# Altium PCB MB1364.PcbDoc (part 2 of 9)
Units mm, origin at the board's own origin, x right, y up, seen from the top; angles counter-clockwise.
Board outline 70 x 133.34 mm, 6 copper layers (Top Layer, Signal Layer 1, Signal Layer 2, Signal Layer 3, Signal Layer 4, Bottom Layer), stack 1.57 mm thick; 321 components, 287 nets, 1372 pads, 2051 vias.
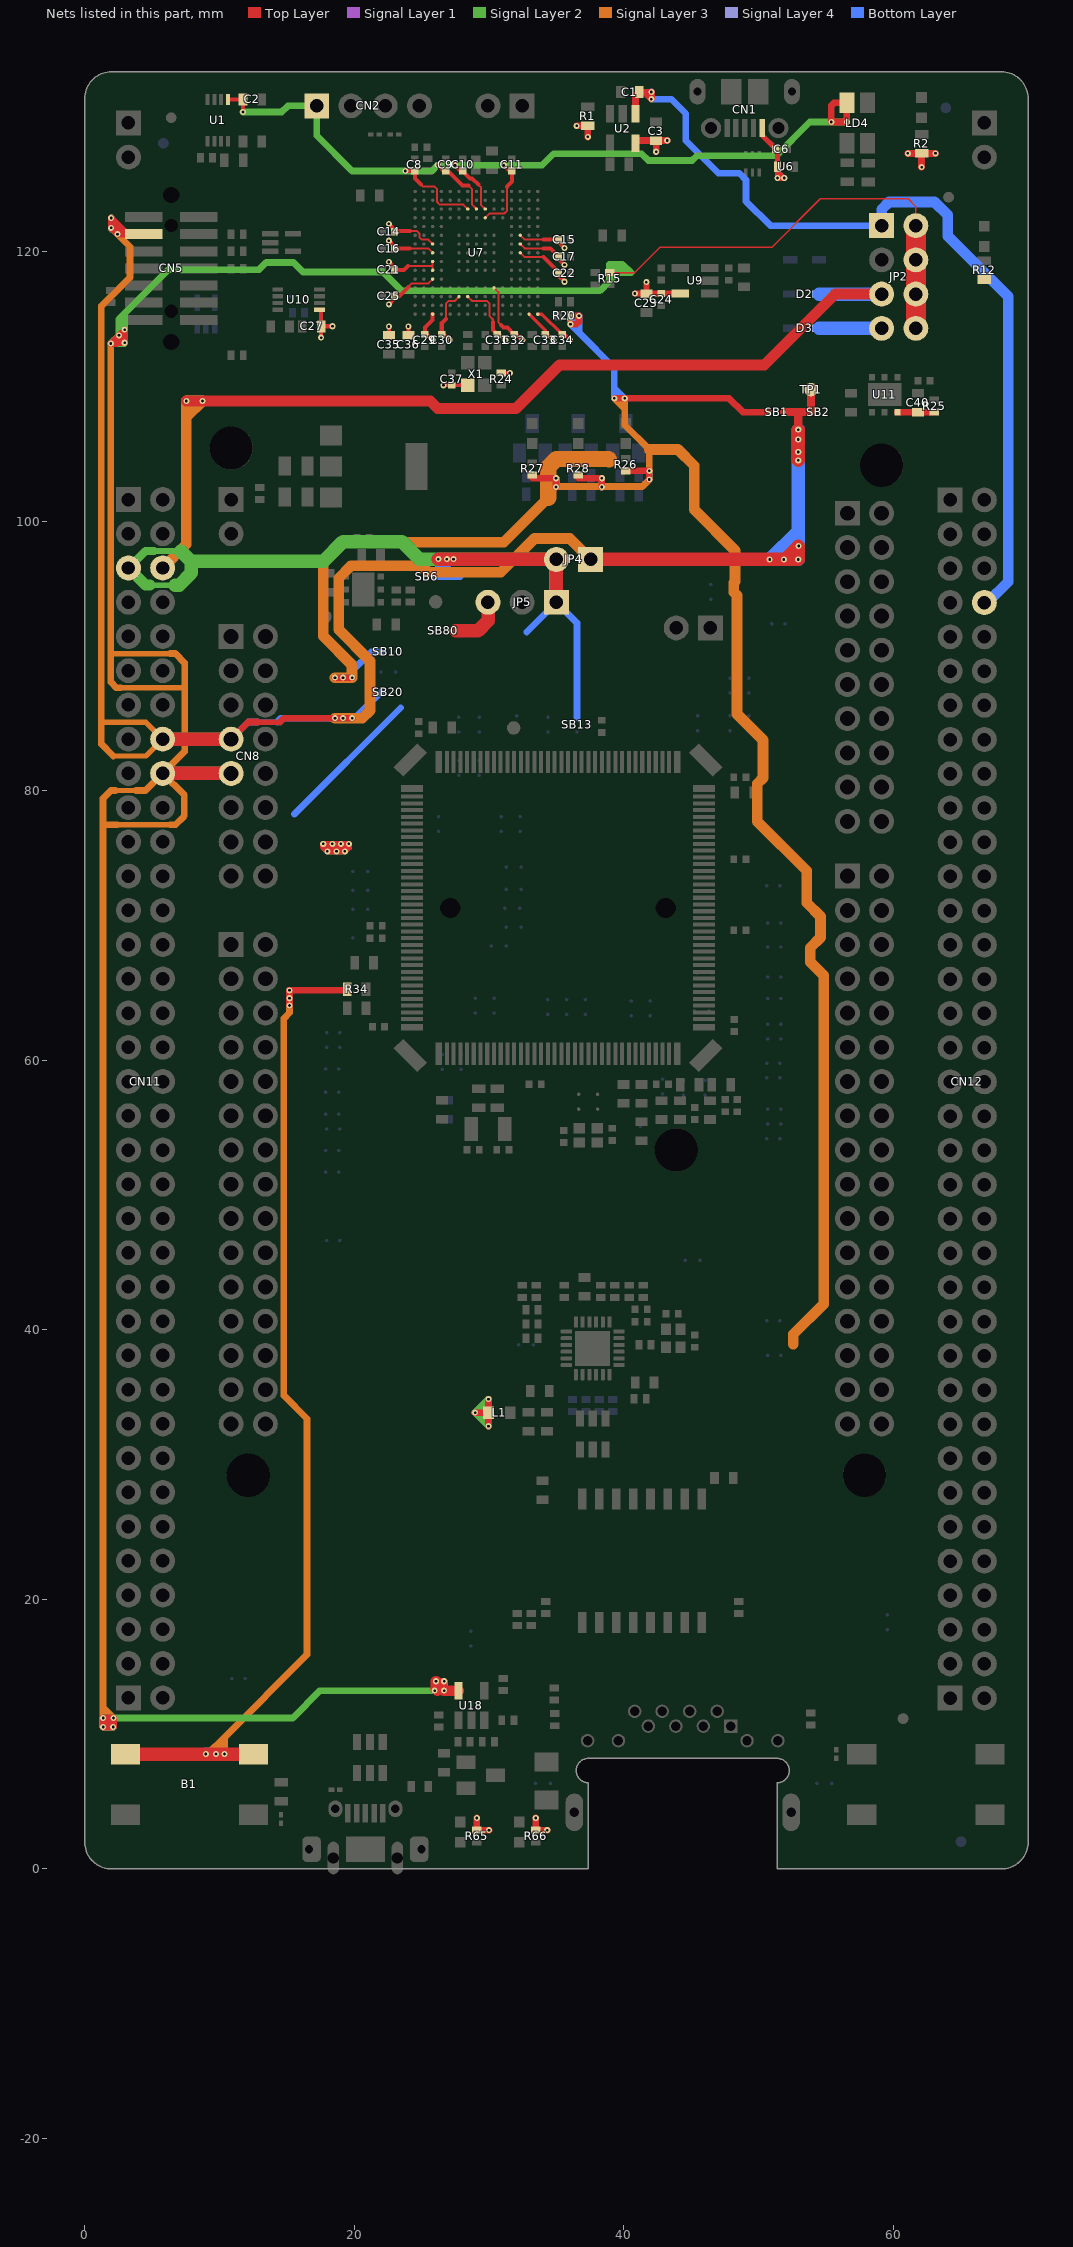
[diagram p6: the nets of this part, all layers, seen from the top]

## Footprints (in the part's own frame and the unit in brackets; to place one, negate y for a bottom-side part, rotate by r counter-clockwise, add the part's x,y. Pads: shape width x height; smd on the part's side, far side on the other; paste and mask are expansions set on the pad) (continued)
ICC_UFBGA201_176+25_10X10_P065 [mm] "IPC"
  round 0.25 smd mask+0.05: A1(-4.55,4.55) A2(-3.9,4.55) A3(-3.25,4.55) A4(-2.6,4.55) A5(-1.95,4.55) A6(-1.3,4.55) A7(-0.65,4.55) A8(0,4.55) A9(0.65,4.55) A10(1.3,4.55) A11(1.95,4.55) A12(2.6,4.55) A13(3.25,4.55) A14(3.9,4.55) A15(4.55,4.55) B1(-4.55,3.9) B2(-3.9,3.9) B3(-3.25,3.9) B4(-2.6,3.9) B5(-1.95,3.9) B6(-1.3,3.9) B7(-0.65,3.9) B8(0,3.9) B9(0.65,3.9) B10(1.3,3.9) B11(1.95,3.9) B12(2.6,3.9) B13(3.25,3.9) B14(3.9,3.9) B15(4.55,3.9) C1(-4.55,3.25) C2(-3.9,3.25) C3(-3.25,3.25) C4(-2.6,3.25) C5(-1.95,3.25) C6(-1.3,3.25) C7(-0.65,3.25) C8(0,3.25) C9(0.65,3.25) C10(1.3,3.25) C11(1.95,3.25) C12(2.6,3.25) C13(3.25,3.25) C14(3.9,3.25) C15(4.55,3.25) D1(-4.55,2.6) D2(-3.9,2.6) D3(-3.25,2.6) D4(-2.6,2.6) D5(-1.95,2.6) D6(-1.3,2.6) D7(-0.65,2.6) D8(0,2.6) D9(0.65,2.6) D10(1.3,2.6) D11(1.95,2.6) D12(2.6,2.6) D13(3.25,2.6) D14(3.9,2.6) D15(4.55,2.6) E1(-4.55,1.95) E2(-3.9,1.95) E3(-3.25,1.95) E4(-2.6,1.95) E12(2.6,1.95) E13(3.25,1.95) E14(3.9,1.95) E15(4.55,1.95) F1(-4.55,1.3) F2(-3.9,1.3) F3(-3.25,1.3) F4(-2.6,1.3) F6(-1.3,1.3) F7(-0.65,1.3) F8(0,1.3) F9(0.65,1.3) F10(1.3,1.3) F12(2.6,1.3) F13(3.25,1.3) F14(3.9,1.3) F15(4.55,1.3) G1(-4.55,0.65) G2(-3.9,0.65) G3(-3.25,0.65) G4(-2.6,0.65) G6(-1.3,0.65) G7(-0.65,0.65) G8(0,0.65) G9(0.65,0.65) G10(1.3,0.65) G12(2.6,0.65) G13(3.25,0.65) G14(3.9,0.65) G15(4.55,0.65) H1(-4.55,0) H2(-3.9,0) H3(-3.25,0) H4(-2.6,0) H6(-1.3,0) H7(-0.65,0) H8(0,0) H9(0.65,0) H10(1.3,0) H12(2.6,0) H13(3.25,0) H14(3.9,0) H15(4.55,0) J1(-4.55,-0.65) J2(-3.9,-0.65) J3(-3.25,-0.65) J4(-2.6,-0.65) J6(-1.3,-0.65) J7(-0.65,-0.65) J8(0,-0.65) J9(0.65,-0.65) J10(1.3,-0.65) J12(2.6,-0.65) J13(3.25,-0.65) J14(3.9,-0.65) J15(4.55,-0.65) K1(-4.55,-1.3) K2(-3.9,-1.3) K3(-3.25,-1.3) K4(-2.6,-1.3) K6(-1.3,-1.3) K7(-0.65,-1.3) K8(0,-1.3) K9(0.65,-1.3) K10(1.3,-1.3) K12(2.6,-1.3) K13(3.25,-1.3) K14(3.9,-1.3) K15(4.55,-1.3) L1(-4.55,-1.95) L2(-3.9,-1.95) L3(-3.25,-1.95) L4(-2.6,-1.95) L12(2.6,-1.95) L13(3.25,-1.95) L14(3.9,-1.95) L15(4.55,-1.95) M1(-4.55,-2.6) M2(-3.9,-2.6) M3(-3.25,-2.6) M4(-2.6,-2.6) M5(-1.95,-2.6) M6(-1.3,-2.6) M7(-0.65,-2.6) M8(0,-2.6) M9(0.65,-2.6) M10(1.3,-2.6) M11(1.95,-2.6) M12(2.6,-2.6) M13(3.25,-2.6) M14(3.9,-2.6) M15(4.55,-2.6) N1(-4.55,-3.25) N2(-3.9,-3.25) N3(-3.25,-3.25) N4(-2.6,-3.25) N5(-1.95,-3.25) N6(-1.3,-3.25) N7(-0.65,-3.25) N8(0,-3.25) N9(0.65,-3.25) N10(1.3,-3.25) N11(1.95,-3.25) N12(2.6,-3.25) N13(3.25,-3.25) N14(3.9,-3.25) N15(4.55,-3.25) P1(-4.55,-3.9) P2(-3.9,-3.9) P3(-3.25,-3.9) P4(-2.6,-3.9) P5(-1.95,-3.9) P6(-1.3,-3.9) P7(-0.65,-3.9) P8(0,-3.9) P9(0.65,-3.9) P10(1.3,-3.9) P11(1.95,-3.9) P12(2.6,-3.9) P13(3.25,-3.9) P14(3.9,-3.9) P15(4.55,-3.9) R1(-4.55,-4.55) R2(-3.9,-4.55) R3(-3.25,-4.55) R4(-2.6,-4.55) R5(-1.95,-4.55) R6(-1.3,-4.55) R7(-0.65,-4.55) R8(0,-4.55) R9(0.65,-4.55) R10(1.3,-4.55) R11(1.95,-4.55) R12(2.6,-4.55) R13(3.25,-4.55) R14(3.9,-4.55) R15(4.55,-4.55)
  silkscreen extent -5.22,-5.07 5.07,5.23, body extent -5.07,-5.07 5.07,5.07, height 0.61
ICC_VQFN24-EPAD_4X4_P050 [mm]
  rrect50% 0.85x0.3 smd mask+0.05: 1(-1.95,1.25) 2(-1.95,0.75) 3(-1.95,0.25) 4(-1.95,-0.25) 5(-1.95,-0.75) 6(-1.95,-1.25) 13(1.95,-1.25) 14(1.95,-0.75) 15(1.95,-0.25) 16(1.95,0.25) 17(1.95,0.75) 18(1.95,1.25)
  rrect50% 0.3x0.85 smd mask+0.05: 7(-1.25,-1.95) 8(-0.75,-1.95) 9(-0.25,-1.95) 10(0.25,-1.95) 11(0.75,-1.95) 12(1.25,-1.95) 19(1.25,1.95) 20(0.75,1.95) 21(0.25,1.95) 22(-0.25,1.95) 23(-0.75,1.95) 24(-1.25,1.95)
  rect 2.6x2.6 smd paste-10 mask+0.05: EP(0,0)
  silkscreen extent -2,-2 2,2, body extent -2.05,-2.05 2.05,2.05, height 1.1
ICC_VSSOP8_DCU_R-PDSO-G8_2X2P30_P050 [mm]
  rect 0.3x0.8 smd mask+0.05: 1(-0.75,-1.55) 2(-0.25,-1.55) 3(0.25,-1.55) 4(0.75,-1.55) 5(0.75,1.55) 6(0.25,1.55) 7(-0.25,1.55) 8(-0.75,1.55)
  silkscreen extent -1.05,-1.2 1.05,1.2, body extent -1.05,-1.62 1.05,1.62, height 0.9
L0603 [mm]
  rect 0.8x0.95 smd mask+0.05: 1(-0.8,0) 2(0.8,0)
  silkscreen extent -1.33,-0.6 1.33,0.6, body extent -0.87,-0.47 0.87,0.47, height 0.95
LED_0603_OSRAM_LG-Q396-PS-35_GREEN_1A2K_H0P4 [mm]
  rect 0.8x0.8 smd mask+0.05: 1(-0.75,0) 2(0.75,0)
  silkscreen extent -0.85,-0.53 1.28,0.53, body extent -0.85,-0.45 0.85,0.45, height 0.6
LED_0603_OSRAM_LS-Q976-NR-1_RED_1A2K_H0P8 [mm]
  rect 0.8x0.8 smd mask+0.05: 1(-0.75,0) 2(0.75,0)
  silkscreen extent -0.85,-0.53 1.28,0.53, body extent -0.85,-0.45 0.85,0.45, height 0.8
LED_0603_OSRAM_LY-Q396-P1Q2-36_YELLOW_1A2K_H0P4 [mm]
  rect 0.8x0.8 smd mask+0.05: 1(-0.75,0) 2(0.75,0)
  silkscreen extent -0.85,-0.53 1.28,0.53, body extent -0.85,-0.45 0.85,0.45, height 0.4
LED_0603_RED [mm]
  rect 0.8x0.8 smd mask+0.05: 1(-0.75,0) 2(0.75,0)
  silkscreen extent -0.25,-0.4 1.25,0.4, body extent -0.8,-0.4 0.8,0.4, height 0.6
LED_0603_VISHAY_VLMS1300-GS08_RED_1A2K_H0P8 [mm]
  rect 0.8x0.8 smd mask+0.05: 1(-0.75,0) 2(0.75,0)
  silkscreen extent -0.85,-0.53 1.28,0.53, body extent -0.85,-0.45 0.85,0.45, height 0.8
LED_BI-GR_HSMF-A201-A00J1 [mm]
  rect 1.1x1.5 smd mask+0.05: 1(-0.75,-1.5) 2(-0.75,1.5) 3(0.75,1.5) 4(0.75,-1.5)
  silkscreen extent -1.65,-1.85 1.65,1.85, body extent -1.5,-1.85 1.5,1.85, height 2.1
MIRE_PLACE_SMD_0P8MM [mm]
  round 0.8 smd paste-10 mask+0.2: 1(0,0)
  Top Layer keep-out circle w0.01: c0,0 r0.804
MOS_SOT23-5L [mm]
  rect 0.6x1.3 smd mask+0.05: 1(-0.95,-1.1) 2(0,-1.1) 3(0.95,-1.1) 4(0.95,1.1) 5(-0.95,1.1)
  silkscreen extent -1.6,-0.95 1.6,0.97, body extent -1.52,-1.25 1.52,1.25, height 1.45
NPN_SOT23 [mm]
  rect 1x1.4 smd mask+0.05: 1(-0.95,-1.1) 2(0.95,-1.1) 3(0,1.1)
  silkscreen extent -1.63,-0.82 1.63,0.82, body extent -1.56,-1.25 1.56,1.25, height 1.1
OSC_NDK_NZ2520SB_4P [mm]
  rect 1x1 smd mask+0.05: 1(-0.825,-0.625) 2(0.825,-0.625) 3(0.825,0.625) 4(-0.825,0.625)
  silkscreen extent -1.43,-1.22 1.2,1.05, body extent -1.3,-1.05 1.3,1.05, height 0.91
R0402 [mm]
  rect 0.51x0.7 smd mask+0.05: 1(-0.45,0) 2(0.45,0)
  silkscreen extent 0,-0.3 0,0.3, body extent -0.52,-0.3 0.52,0.3, height 0.4
R0603 [mm]
  rect 0.64x1 smd mask+0.05: 1(-0.7,0) 2(0.7,0)
  silkscreen extent -1.05,-0.58 1.05,0.58, body extent -0.9,-0.5 0.9,0.5, height 0.56
REG_SOT23-5L [mm]
  rect 0.6x1.3 smd mask+0.05: 1(-0.95,-1.1) 2(0,-1.1) 3(0.95,-1.1) 4(0.95,1.1) 5(-0.95,1.1)
  silkscreen extent -1.6,-0.95 1.6,0.97, body extent -1.52,-1.25 1.52,1.25, height 1.1
REG_SOT223-TAB [mm]
  rect 1.5x1.65 smd mask+0.05: 1(-2.3,-3.175) 2(0,-3.175) 3(2.3,-3.175)
  rect 3.5x1.65 smd mask+0.05: 4(0,3.175)
  silkscreen extent -3.35,-2.15 3.35,2.12, body extent -3.35,-3.48 3.35,3.48, height 1.8
Sheetbox_6L2S [mil] "Sheetbox 6 layers / 2 silkscreens"
  round 20 on Mech16: 1(813.5,208.05) 1(2736.63,208.05)
SOLDER-BRIDGE_R0402-0R [mil] "MCD-01619"
  round 10 smd paste-393.7: 1(-17.72,0) 2(20.67,0)
  Top Layer region: -30.51,-13.78 -30.51,13.78 -8.37,13.78 -1.48,0 -8.37,-13.78
  Top Layer region: 1.48,13.78 8.37,0 1.48,-13.78 30.51,-13.78 30.51,13.78
  silkscreen extent -33,-17 33,17, body extent -20,-12 20,12, height 14
SOLDER-BRIDGE_R0603-0R [mil]
  round 10 smd paste-393.7: 1(-19.68,0) 2(23.62,0)
  Top Layer region: -5.91,19.68 13.78,0 -5.91,-19.69 47.24,-19.69 47.24,19.68 -5.91,19.68
  Top Layer region: -47.24,-19.69 -47.24,19.68 -15.75,19.68 3.94,0 -15.75,-19.69 -47.24,-19.69
  silkscreen extent -50,-23 50,23, body extent -36,-20 36,20, height 22
SWI_WEALTHMETAL_TD-0341_4P_BLACK [mm]
  rect 1.52x2.16 smd mask+0.05: 1(-2.25,-4.75) 2(-2.25,4.75) 3(2.25,-4.75) 4(2.25,4.75)
  silkscreen extent -3,-3.5 3,3.5, body extent -3,-5.15 3,5.15, height 7.55
SWI_WEALTHMETAL_TD-0341_4P_BLUE [mm]
  rect 1.52x2.16 smd mask+0.05: 1(-2.25,-4.75) 2(-2.25,4.75) 3(2.25,-4.75) 4(2.25,4.75)
  silkscreen extent -3,-3.5 3,3.5, body extent -3,-5.15 3,5.15, height 7.55
TP_SMD_1MM [mm]
  round 1 smd paste-10 mask+0.05: 1(0,0)
  silkscreen extent -0.7,-0.7 0.7,0.7
TRS_DGKYD_KMS-1102NL [mm]
  rect 0.64x1.55 smd mask+0.05: 1(-4.445,-4.575) 2(-3.175,-4.575) 3(-1.905,-4.575) 4(-0.635,-4.575) 5(0.635,-4.575) 6(1.905,-4.575) 7(3.175,-4.575) 8(4.445,-4.575) 9(4.445,4.575) 10(3.175,4.575) 11(1.905,4.575) 12(0.635,4.575) 13(-0.635,4.575) 14(-1.905,4.575) 15(-3.175,4.575) 16(-4.445,4.575)
  silkscreen extent -6.35,-3.7 6.35,3.7, body extent -6.35,-4.7 6.35,4.7, height 6.3

## Part data
B1: library part MCD-00002, "Non-Open Push-Button 0.1A 24V BLUE", Manufacturer=WEALTHMETAL, Manufacturer_Part_Number=TD0341X-G01-BLU, ComponentLink1Description=Datasheet, ComponentLink1URL=http://tunmcdsvn.tun.st.com/Component_Datasheet_Library/Trunk/Misc/Wealthmetal_Tact-Switch_TD0341, Initial_Board_Reference=MB1274, Internal_Part_Number=MCD-00002, Order_Code_Farnell=535-930, Part_Type=Misc, Provided_By=Subcon, Status=Released
B2: library part MCD-00001, "Non-Open Push-Button 0.1A 24V BLACK", Manufacturer=WEALTHMETAL, Manufacturer_Part_Number=TD0341X-G01-BLA, ComponentLink1Description=Datasheet, ComponentLink1URL=http://tunmcdsvn.tun.st.com/Component_Datasheet_Library/Trunk/Misc/Wealthmetal_Tact-Switch_TD0341, Initial_Board_Reference=MB1274, Internal_Part_Number=MCD-00001, Order_Code_Farnell=535-930, Part_Type=Misc, Provided_By=Subcon, Status=Released
C1 C3 C18 C61 C64 C66: library part MCD-00238, "Capacitor, MLCC, 1uF, 6V3, X5R, 10%, 0603, T=0,8mm", Manufacturer=YAGEO, Manufacturer_Part_Number=CC0603KRX5R5BB105, Package=C0603, ComponentLink1Description=Datasheet, ComponentLink1URL=http://tunmcdsvn.tun.st.com/Component_Datasheet_Library/Trunk/Capacitors/Yageo_Multilayer_capacitor_X5R_series_100pF_to_100uF, Initial_Board_Reference=MB1319, Internal_Part_Number=MCD-00238, Part_Type=Capacitor, Provided_By=Subcon, Status=Released
C2 C4 C26 C27 C44 C59 C65 C68 C73 C78 C79 C80 C82 C83: library part MCD-00237, "Capacitor, MLCC, 100nF, 6V3, X5R, 10%, 0603, T=0,8mm", Manufacturer=YAGEO, Manufacturer_Part_Number=CC0603KRX5R5BB104, Package=C0603, ComponentLink1Description=Datasheet, ComponentLink1URL=http://tunmcdsvn.tun.st.com/Component_Datasheet_Library/Trunk/Capacitors/Yageo_Multilayer_capacitor_X5R_series_100pF_to_100uF, Initial_Board_Reference=MB1319, Internal_Part_Number=MCD-00237, Part_Type=Capacitor, Provided_By=Subcon, Status=Released
C5: library part MCD-00016, "Capacitor, MLCC, 20pF, 50V, NPO, 5%, 0402, T=0,5mm", Manufacturer=YAGEO, Manufacturer_Part_Number=CC0402JRNPO9BN200, Package=C0402, ComponentLink1Description=Datasheet, ComponentLink1URL=http://tunmcdsvn.tun.st.com/Component_Datasheet_Library/Trunk/Capacitors/Yageo_Capacitor_NP0_16V-to-50V, Initial_Board_Reference=MB1274, Internal_Part_Number=MCD-00016, Part_Type=Capacitor, Provided_By=Subcon, Status=Released
C6: library part MCD-00205, "Capacitor, MLCC, 100pF, 50V, NPO, 5%, 0402, T=0,5mm", Manufacturer=YAGEO, Manufacturer_Part_Number=CC0402JRNPO9BN101, Package=C0402, ComponentLink1Description=Datasheet, ComponentLink1URL=http://tunmcdsvn.tun.st.com/Component_Datasheet_Library/Trunk/Capacitors/Yageo_Capacitor_NP0_16V-to-50V, Initial_Board_Reference=MB1361, Internal_Part_Number=MCD-00205, Part_Type=Capacitor, Provided_By=Subcon, Status=Released
C7 C12 C13 C48 C50: library part MCD-00012, "Capacitor, MLCC, 2.2uF, 10V, X5R, 10%, 0603, T=0,8mm", Alternate_Manufacturer=KEMET, Alternate_Manufacturer_Part_Number=C0603C225K8PACTU, Manufacturer=YAGEO, Manufacturer_Part_Number=CC0603KRX5R6BB225, Package=C0603, ComponentLink1Description=Datasheet, ComponentLink1URL=http://tunmcdsvn.tun.st.com/Component_Datasheet_Library/Trunk/Capacitors/Yageo_Multilayer_capacitor_X5R_series_100pF_to_100uF, Initial_Board_Reference=MB1274, Internal_Part_Number=MCD-00012, Part_Type=Capacitor, Status=Released
  C7 C48 C50: Provided_By=Subcon
  C12 C13: Provided_By=SUBCO
C8 C9 C10 C11 C14 C15 C16 C17 C20 C21 C22 C24 C25 C28 C29 C30 C31 C32 C33 C34 C37: library part MCD-00102, "Capacitor, MLCC, 100nF, 16V, X7R, 10%, 0402, T=0,5mm", Manufacturer=YAGEO, Manufacturer_Part_Number=CC0402KRX7R7BB104, Package=C0402, ComponentLink1Description=Datasheet, ComponentLink1URL=http://tunmcdsvn.tun.st.com/Component_Datasheet_Library/Trunk/Capacitors/Yageo_Multilayer_Capacitor_X7R_series_100pF_to_22uF, Initial_Board_Reference=MB1262, Internal_Part_Number=MCD-00102, Part_Type=Capacitor, Provided_By=Subcon, Status=Released
C19: library part MCD-00011, "Capacitor, MLCC, 10nF, 16V, X7R, 10%, 0402, T=0.5mm", Manufacturer=YAGEO, Manufacturer_Part_Number=CC0402KRX7R7BB103, Package=C0402, ComponentLink1Description=Datasheet, ComponentLink1URL=http://tunmcdsvn.tun.st.com/Component_Datasheet_Library/Trunk/Capacitors/Yageo_Multilayer_Capacitor_X7R_series_100pF_to_22uF, Initial_Board_Reference=MB1274, Internal_Part_Number=MCD-00011, Part_Type=Capacitor, Provided_By=Subcon, Status=Released
C23 C36: library part MCD-00010, "Capacitor, MLCC, 1uF, 16V, X5R, 10%, 0603, T=0,8mm", Manufacturer=YAGEO, Manufacturer_Part_Number=CC0603KRX5R7BB105, Package=C0603, ComponentLink1Description=Datasheet, ComponentLink1URL=http://tunmcdsvn.tun.st.com/Component_Datasheet_Library/Trunk/Capacitors/Yageo_Multilayer_capacitor_X5R_series_100pF_to_100uF, Initial_Board_Reference=MB1274, Internal_Part_Number=MCD-00010, Part_Type=Capacitor, Provided_By=Subcon, Status=Released
C35 C84: library part MCD-00009, "Capacitor, MLCC, 4.7uF, 16V, X5R, 10%, 0603, T=0.8mm", Manufacturer=YAGEO, Manufacturer_Part_Number=CC0603KRX5R7BB475, Package=C0603, ComponentLink1Description=Datasheet, ComponentLink1URL=http://tunmcdsvn.tun.st.com/Component_Datasheet_Library/Trunk/Capacitors/Yageo_Multilayer_capacitor_X5R_series_100pF_to_100uF, Initial_Board_Reference=MB1274, Internal_Part_Number=MCD-00009, Part_Type=Capacitor, Provided_By=subcon, Status=Released
C38 C62 C63: library part MCD-00006, "Capacitor, MLCC, 100nF, 16V, X7R, 10%, 0402, T=0.5mm", Manufacturer=YAGEO, Manufacturer_Part_Number=CC0402KRX7R7BB104, Package=C0402, ComponentLink1Description=Datasheet, ComponentLink1URL=http://tunmcdsvn.tun.st.com/Component_Datasheet_Library/Trunk/Capacitors/Yageo_Multilayer_Capacitor_X7R_series_100pF_to_22uF, Initial_Board_Reference=MB1274, Internal_Part_Number=MCD-00006, Part_Type=Capacitor, Provided_By=Subcon, Status=Released
C39 C45 C60: library part MCD-01121, "Capacitor, MLCC, 4.7µF, 10V, X5R, 20%, 0603, T=0,8mm", Manufacturer=MURATA, Manufacturer_Part_Number=GRM188R61A475ME15, Package=C0603, ComponentLink1Description=Datasheet, ComponentLink1URL=http://tunmcdsvn.tun.st.com/Component_Datasheet_Library/Trunk/Capacitors/Murata_Capacitor_GR_series, Initial_Board_Reference=MB1361, Internal_Part_Number=MCD-01121, Part_Type=Capacitor, Provided_By=Subcon, Status=Released
C40 C43: library part MCD-00097, "Capacitor, MLCC, 4.7uF, 16V, X5R, 20%, 0603, T=0,8mm", Manufacturer=MURATA, Manufacturer_Part_Number=GRM188R61C475MAAJ, Package=C0603, ComponentLink1Description=Datasheet, ComponentLink1URL=http://tunmcdsvn.tun.st.com/Component_Datasheet_Library/Trunk/Capacitors/Murata_Capacitor_GR_series, Initial_Board_Reference=MB1262, Internal_Part_Number=MCD-00097, Part_Type=Capacitor, Provided_By=Subcon, Status=Released
C41 C42: library part MCD-00014, "Capacitor, MLCC, 10uF, 25V, X5R, 10%, 0805, T=0,85mm", Manufacturer=YAGEO, Manufacturer_Part_Number=CC0805KRX5R8BB106, Package=C0805, ComponentLink1Description=Datasheet, ComponentLink1URL=http://tunmcdsvn.tun.st.com/Component_Datasheet_Library/Trunk/Capacitors/Yageo_Multilayer_capacitor_X5R_series_100pF_to_100uF, Initial_Board_Reference=MB1274, Internal_Part_Number=MCD-00014, Part_Type=Capacitor, Provided_By=Subcon, Status=Released
C46 C47 C49 C51 C52 C53 C54 C55 C56 C57 C58 C67: library part MCD-01123, "Capacitor, MLCC,100nF, 10V, X7R, 10%, 0402, T=0.5mm", Manufacturer=MURATA, Manufacturer_Part_Number=GRM155R71A104KA01, Package=C0402, ComponentLink1Description=Datasheet, ComponentLink1URL=http://tunmcdsvn.tun.st.com/Component_Datasheet_Library/Trunk/Capacitors/Murata_Capacitor_GR_series, Initial_Board_Reference=MB1361, Internal_Part_Number=MCD-01123, Part_Type=Capacitor, Provided_By=Subcon, Status=Released
C69 C70 C75 C77: library part MCD-01374, "Capacitor, MLCC, 5.6pF, 50V, NPO, 5%, 0402, T=0,5mm", Manufacturer=YAGEO, Manufacturer_Part_Number=CC0402BRNPO9BN5R6, Package=C0402, ComponentLink1Description=Datasheet, ComponentLink1URL=http://tunmcdsvn.tun.st.com/Component_Datasheet_Library/Trunk/Capacitors/Yageo_Capacitor_NP0_16V-to-50V, Initial_Board_Reference=MB1363, Internal_Part_Number=MCD-01374, Part_Type=Capacitor, Provided_By=Subcon, Status=Checked
C71 C72: library part MCD-00003, "Capacitor, MLCC, 5.1pF, 50V, NPO, +-0.25pF, 0402, T=0.5mm", Manufacturer=YAGEO, Manufacturer_Part_Number=CC0402CRNPO9BN5R1, Package=C0402, ComponentLink1Description=Datasheet, ComponentLink1URL=http://tunmcdsvn.tun.st.com/Component_Datasheet_Library/Trunk/Capacitors/Yageo_Capacitor_NP0_16V-to-50V, Initial_Board_Reference=MB1274, Internal_Part_Number=MCD-00003, Part_Type=Capacitor, Provided_By=Subcon, Status=Released
C74: library part MCD-00095, "Capacitor, MLCC, 1uF, 6V3, X5R, 10%, 0402, T=0,5mm", Manufacturer=MURATA, Manufacturer_Part_Number=GRM155R60J105KE19, Package=C0402, ComponentLink1Description=Datasheet, ComponentLink1URL=http://tunmcdsvn.tun.st.com/Component_Datasheet_Library/Trunk/Capacitors/Murata_Capacitor_GR_series, Initial_Board_Reference=MB1262, Internal_Part_Number=MCD-00095, Part_Type=Capacitor, Provided_By=Subcon, Status=Released
C76: library part MCD-00724, "Capacitor, MLCC, 470pF, 50V, NPO, 5%, 0402, T=0,5mm", Manufacturer=YAGEO, Manufacturer_Part_Number=CC0402JRNPO9BN471, Package=C0402, ComponentLink1Description=Datasheet, ComponentLink1URL=http://tunmcdsvn.tun.st.com/Component_Datasheet_Library/Trunk/Capacitors/Yageo_Capacitor_NP0_16V-to-50V, Initial_Board_Reference=MB1271, Internal_Part_Number=MCD-00724, Part_Type=Capacitor, Provided_By=Subcon, Status=Checked
C81: library part MCD-01124, "Capacitor, MLCC, 10µF, 10V, X5R, 10%, 0603, T=0.8mm", Manufacturer=MURATA, Manufacturer_Part_Number=GRM188R61A106KAAL, Package=C0603, ComponentLink1Description=Datasheet, ComponentLink1URL=http://tunmcdsvn.tun.st.com/Component_Datasheet_Library/Trunk/Capacitors/Murata_Capacitor_GR_series, Initial_Board_Reference=MB1361, Internal_Part_Number=MCD-01124, Part_Type=Capacitor, Provided_By=Subcon, Status=Released
C85: library part MCD-00722, "Capacitor, MLCC, 1nF, 2KV, X7R, 10%, 1206, T=1,25mm", Manufacturer=YAGEO, Manufacturer_Part_Number=CC1206KKX7RDBB102, Package=C1206, ComponentLink1Description=Datasheet, ComponentLink1URL=http://tunmcdsvn.tun.st.com/Component_Datasheet_Library/Trunk/Capacitors/Yageo_Multilayer_Capacitor_NPO_X7R_1KV_to_3KV_10pF_to_33nF/, Initial_Board_Reference=MB1271, Internal_Part_Number=MCD-00722, Part_Type=Capacitor, Provided_By=Subcon, Status=Checked
CN1: library part MCD-00028, "USB-MICRO-B, 0.65mm, RA, SMT, Bottom Mount,", Manufacturer=MOLEX, Manufacturer_Part_Number=1050170001, ComponentLink1Description=Datasheet, ComponentLink1URL=http://tunmcdsvn.tun.st.com/Component_Datasheet_Library/Trunk/Connectors/Molex_Connector-USB-microB_105017-0001, Initial_Board_Reference=MB1274, Internal_Part_Number=MCD-00028, Part_Type=Connector, Provided_By=Subcon, Status=Released
CN2: library part MCD-00029, "Header, 4x1, 2,54mm, VR, TH, Height 5.84mm/2.54mm", Manufacturer=SAMTEC, Manufacturer_Part_Number=TSW-104-07-x-S, ComponentLink1Description=Datasheet, ComponentLink1URL=http://tunmcdsvn.tun.st.com/Component_Datasheet_Library/Trunk/Connectors/Samtec_TSW-HTSW-series, Initial_Board_Reference=MB1274, Internal_Part_Number=MCD-00029, Part_Type=Connector, Provided_By=Subcon, Status=Released
CN3 CN4 CN15 CN16: library part MCD-00214, "Header, 2x1, 2,54mm, VR, TH, Height 5.84mm/10.16mm", Manufacturer=SAMTEC, Manufacturer_Part_Number=TSW-102-09-x-S, ComponentLink1Description=Datasheet, ComponentLink1URL=http://tunmcdsvn.tun.st.com/Component_Datasheet_Library/Trunk/Connectors/Samtec_TSW-HTSW-series, Initial_Board_Reference=MB1319, Internal_Part_Number=MCD-00214, Part_Type=Connector, Provided_By=Subcon, Status=Released
CN5: library part MCD-01226, "Header 5x2, 1.27mm, Dual row, Straight, Surface mount, vertical male connector. 3.05mm lead. Mates with FFSD connector. Footprint compatible with FTSH-107-01-L-DV,-K,-A,-P,-ES (STDC14 MEDIUM)", Manufacturer=SAMTEC, Manufacturer_Part_Number=FTSH-105-01-L-DV-K, ComponentLink1Description=Datasheet, ComponentLink1URL=http://tunmcdsvn.tun.st.com/Component_Datasheet_Library/Trunk/Connectors/Samtec_FTSH_smt_series, Initial_Board_Reference=MCD16-052, Internal_Part_Number=MCD-01226, Part_Type=Connector, Provided_By=Subcon, Status=Checked
CN7: library part MCD-01039, "Socket, 10x2, 2.54mm, VR, TH, Height 8.51mm/10mm, Low insertion force.", Manufacturer=SAMTEC, Manufacturer_Part_Number=SSW-110-23-x-D, ComponentLink1Description=Datasheet, ComponentLink1URL=http://tunmcdsvn.tun.st.com/Component_Datasheet_Library/Trunk/Connectors/Samtec_SSW-SSQ-series, Initial_Board_Reference=MB1361, Internal_Part_Number=MCD-01039, Part_Type=Connector, Provided_By=Subcon, Remark="Socket dedicated to Arduino+ZIO connector on NUCLEO144", Status=Checked
CN8: library part MCD-01037, "Socket, 8x2, 2.54mm, VR, TH, Height 8.51mm/10mm, Low insertion force.", Manufacturer=SAMTEC, Manufacturer_Part_Number=SSW-108-23-x-D, ComponentLink1Description=Datasheet, ComponentLink1URL=http://tunmcdsvn.tun.st.com/Component_Datasheet_Library/Trunk/Connectors/Samtec_SSW-SSQ-series, Initial_Board_Reference=MB1361, Internal_Part_Number=MCD-01037, Part_Type=Connector, Provided_By=Subcon, Remark="Socket dedicated to Arduino+ZIO connector on NUCLEO144", Status=Checked
CN9: library part MCD-01040, "Socket, 15x2, 2.54mm, VR, TH, Height 8.51mm/10mm, Low insertion force.", Manufacturer=SAMTEC, Manufacturer_Part_Number=SSW-115-23-x-D, ComponentLink1Description=Datasheet, ComponentLink1URL=http://tunmcdsvn.tun.st.com/Component_Datasheet_Library/Trunk/Connectors/Samtec_SSW-SSQ-series, Initial_Board_Reference=MB1361, Internal_Part_Number=MCD-01040, Part_Type=Connector, Provided_By=Subcon, Remark="Socket dedicated to Arduino+ZIO connector on NUCLEO144", Status=Checked
CN10: library part MCD-01041, "Socket, 17x2, 2.54mm, VR, TH, Height 8.51mm/10mm, Low insertion force", Manufacturer=SAMTEC, Manufacturer_Part_Number=SSW-117-23-x-D, ComponentLink1Description=Datasheet, ComponentLink1URL=http://tunmcdsvn.tun.st.com/Component_Datasheet_Library/Trunk/Connectors/Samtec_SSW-SSQ-series, Initial_Board_Reference=MB1361, Internal_Part_Number=MCD-01041, Part_Type=Connector, Provided_By=Subcon, Remark="Socket dedicated to Arduino+ZIO connector on NUCLEO144", Status=Checked
CN11 CN12: library part MCD-01210, "Header, 35x2, 2,54mm, VR, TH, Height 5.84mm/2.54mm", Manufacturer=SAMTEC, Manufacturer_Part_Number=TSW-135-07-x-D, ComponentLink1Description=Datasheet, ComponentLink1URL=http://tunmcdsvn.tun.st.com/Component_Datasheet_Library/Trunk/Connectors/Samtec_TSW-HTSW-series, Initial_Board_Reference=MB1361, Internal_Part_Number=MCD-01210, Part_Type=Connector, Provided_By=Subcon, Status=Checked
CN13: library part MCD-00661, "USB-MICRO-AB Receptacle, RA, SMT + DIP, Standard, Top Mount, USB certified (symbol & footprint compatible with MCD-00022)", Manufacturer=HIROSE, Manufacturer_Part_Number=ZX62RD-AB-5P8(30), ComponentLink1Description=Datasheet, ComponentLink1URL=http://tunmcdsvn.tun.st.com/Component_Datasheet_Library/Trunk/Connectors/Hirose_ZX_catalog-939768, Initial_Board_Reference=MB1311, Internal_Part_Number=MCD-00661, Part_Type=Connector, Provided_By=SUBCO, Remark="compatible with MCD-00022", Status=Checked
CN14: library part MCD-00717, "RJ45 jack, single port, with LEDS, Metal shielded dip low profile", Manufacturer="DONGGUAN KEYOUDA ELECTRONIC TECHNOLOGY", Manufacturer_Part_Number=KRJ-CB4.2GYZNL, ComponentLink1Description=Datasheet, ComponentLink1URL=http://tunmcdsvn.tun.st.com/Component_Datasheet_Library/Trunk/Connectors/DGKYD_RJ45_KRJ-CB4.2GYZNL, Initial_Board_Reference=MB1271, Internal_Part_Number=MCD-00717, Part_Type=Connector, Provided_By=Subcon, Status="Footprint available"
D1 D2 D3: library part MCD-00034, Manufacturer=STMICROELECTRONICS, ComponentLink1Description=Datasheet, ComponentLink1URL=http://tunmcdsvn.tun.st.com/Component_Datasheet_Library/Trunk/Diodes/STM_Diode_BAT60JFILM-SOD323, Initial_Board_Reference=MB1274, Internal_Part_Number=MCD-00034, Manufacturer_Part_Number=BAT60JFILM, Part_Type=Diode, Provided_By=Subcon, Status=Released
JP1: library part MCD-00045, "Header, 2x1, 2,54mm, VR, TH, Height 5.84mm/2.54mm", Manufacturer=SAMTEC, Manufacturer_Part_Number=TSW-102-07-x-S, ComponentLink1Description=Datasheet, ComponentLink1URL=http://tunmcdsvn.tun.st.com/Component_Datasheet_Library/Trunk/Connectors/Samtec_TSW-HTSW-series, Initial_Board_Reference=MB1274, Internal_Part_Number=MCD-00045, Part_Type=Connector, Provided_By=Subcon, Remark="3D KO: BZ: 40098", Status="Footprint available"
JP2: library part MCD-00686, "Header, 4x2, 2,54mm, VR, TH, Height 5.84mm/2.54mm - Shunt Fitted 1-2", Manufacturer=SAMTEC, Manufacturer_Part_Number=TSW-104-07-x-D, ComponentLink1Description=Datasheet, ComponentLink1URL=http://tunmcdsvn.tun.st.com/Component_Datasheet_Library/Trunk/Connectors/Samtec_TSW-HTSW-series, Initial_Board_Reference=MB1331, Internal_Part_Number=MCD-00686, Part_Type=Connector, Provided_By=Subcon, Remark="Shunt Fitted 1-2", Status=Checked
JP3 JP4 JP6: library part MCD-00683, "Header, 2x1, 2,54mm, VR, TH, Height 5.84mm/2.54mm - Shunt Fitted by default", Manufacturer=SAMTEC, Manufacturer_Part_Number=TSW-102-07-x-S, ComponentLink1Description=Datasheet, ComponentLink1URL=http://tunmcdsvn.tun.st.com/Component_Datasheet_Library/Trunk/Connectors/Samtec_TSW-HTSW-series, Initial_Board_Reference=MB1331, Internal_Part_Number=MCD-00683, Part_Type=Connector, Provided_By=Subcon, Remark="Shunt Fitted", Status=Released
JP5: library part MCD-00684, "Header, 3x1, 2,54mm, VR, TH, Height 5.84mm/2.54mm - Shunt Fitted 1-2 by default", Manufacturer=SAMTEC, Manufacturer_Part_Number=TSW-103-07-F-S, ComponentLink1Description=Datasheet, ComponentLink1URL=http://tunmcdsvn.tun.st.com/Component_Datasheet_Library/Trunk/Connectors/Samtec_TSW-HTSW-series, Initial_Board_Reference=MB1331, Internal_Part_Number=MCD-00684, Part_Type=Connector, Provided_By=Subcon, Remark="Shunt Fitted 1-2", Status=Released
L1: library part MCD-00047, "SMD Chip ferrite bead, 600R@100MHz +/-25%, 350mA, 500mohm DC, 0603, T=0.8mm", Manufacturer=TAI-TECH, Manufacturer_Part_Number=FCM1608KF-601T03, ComponentLink1Description=Datasheet, ComponentLink1URL=http://tunmcdsvn.tun.st.com/Component_Datasheet_Library/Trunk/Inductors/TaiTech_Bead_FCM1608_series, Initial_Board_Reference=MB1274, Internal_Part_Number=MCD-00047, Part_Type=Inductor, Provided_By=Subcon, Status=Released
LD1 LD5 LD8: library part MCD-00588, "LED Green, 0603 SMD, Forward Voltage Typ=2V, Max=2.5V", Alternate_Manufacturer="VISHAY SEMICONDUCTOR OPTO DIVISION", Alternate_Manufacturer_Part_Number=VLMTG1300-GS08, Manufacturer="OSRAM OPTO SEMICONDUCTORS", Manufacturer_Part_Number="LG Q396-PS-35", Package="LED 0603", ComponentLink1Description=Datasheet, ComponentLink1URL="http://tunmcdsvn.tun.st.com/Component_Datasheet_Library/Trunk/Display/OSRAM_LED_GREEN_LG Q396-PS-35", Initial_Board_Reference=MB1331, Internal_Part_Number=MCD-00588, Order_Code_Digikey="LG Q396-PS-35-ND", Part_Type=Display, Provided_By=Subcon, Status=Checked
LD2: library part MCD-01061, "LED Yellow, 0603 SMD, Forward Voltage min=1.7V, Typ=2V, Max=2.3V", Manufacturer="OSRAM OPTO SEMICONDUCTORS", Manufacturer_Part_Number="LY Q396-P1Q2-36", ComponentLink1Description=Datasheet, ComponentLink1URL="http://tunmcdsvn.tun.st.com/Component_Datasheet_Library/Trunk/Display/OSRAM_LED_0603_YELLOW_LY Q396-P1Q2-36", Initial_Board_Reference=MB1331, Internal_Part_Number=MCD-01061, Part_Type=Display, Provided_By=Subcon, Status=Checked
LD3: library part MCD-00586, "LED Red, 0603 SMD, Forward Voltage Typ=2V, Max=2.5V", Alternate_Manufacturer="VISHAY SEMICONDUCTOR OPTO DIVISION", Alternate_Manufacturer_Part_Number=VLMS1300-GS08, Manufacturer="OSRAM OPTO SEMICONDUCTORS", Manufacturer_Part_Number="LS Q976-NR-1", Package="LED 0603", ComponentLink1Description=Datasheet, ComponentLink1URL="http://tunmcdsvn.tun.st.com/Component_Datasheet_Library/Trunk/Display/OSRAM_LED_RED_LS Q976-NR-1", Initial_Board_Reference=MB1331, Internal_Part_Number=MCD-00586, Order_Code_Digikey=475-2512-1-ND, Part_Type=Display, Provided_By=Subcon, Status=Checked
LD4: library part MCD-00051, "LED Bicolor", Alternate_Manufacturer=EVERLUCK, Alternate_Manufacturer_Part_Number=LE-RGW35280, Manufacturer="AVAGO TECHNOLOGIES", Manufacturer_Part_Number=HSMF-A201-A00J1, ComponentLink1Description=Datasheet, ComponentLink1URL=http://tunmcdsvn.tun.st.com/Component_Datasheet_Library/Trunk/Display/Avago_LED-SMC_HSMx-A2xx-02Feb2012, Initial_Board_Reference=MB1274, Internal_Part_Number=MCD-00051, Part_Type=Display, Provided_By=Subcon, Status=Released
LD6: library part MCD-00049, "LED, Red, 0603", Manufacturer=EVERLIGHT, Manufacturer_Part_Number=19-213-R6C-AP1Q2B/3T, Package="LED 0603", ComponentLink1Description=Datasheet, ComponentLink1URL=http://tunmcdsvn.tun.st.com/Component_Datasheet_Library/Trunk/Display/Everlight_SMD-LED-RED_19-213-R6C-AP1Q2B-3T-V3.doc, Initial_Board_Reference=MB1274, Internal_Part_Number=MCD-00049, Part_Type=Display, Provided_By=Subcon, Status=Released
LD7: library part MCD-00587, "LED Red, 0603 SMD, 2V Forward Voltage", Alternate_Manufacturer="OSRAM OPTO SEMICONDUCTORS", Alternate_Manufacturer_Part_Number="LS Q976-NR-1", Manufacturer=VISHAY, Manufacturer_Part_Number=VLMS1300-GS08, Package="LED 0603", ComponentLink1Description=Datasheet, ComponentLink1URL=http://tunmcdsvn.tun.st.com/Component_Datasheet_Library/Trunk/Display/VISHAY_LED_RED_VLMS1300-GS08, Initial_Board_Reference=MB1331, Internal_Part_Number=MCD-00587, Order_Code_Digikey=VLMS1300-GS08CT-ND, Order_Code_Farnell=2078728, Part_Type=Display, Provided_By=Subcon, Status=Checked
Q1 Q2 Q3 T1: library part MCD-00073, "NPN Bipolar Transistor", Manufacturer=NXP, Manufacturer_Part_Number=BSR14, ComponentLink1Description=Datasheet, ComponentLink1URL=http://tunmcdsvn.tun.st.com/Component_Datasheet_Library/Trunk/IC/NXP_Transistor_BSR14, Initial_Board_Reference=MB1274, Internal_Part_Number=MCD-00073, Part_Type=IC, Provided_By=Subcon, Status=Released
R1 R4 R64 R68 R69 R70: library part MCD-00223, "Resistor,100K,0603,1%,1/10W", Manufacturer=YAGEO, Manufacturer_Part_Number=RC0603FR-07100KL, Package=R0603, ComponentLink1Description=Datasheet, ComponentLink1URL=http://tunmcdsvn.tun.st.com/Component_Datasheet_Library/Trunk/Resistors/Yageo_Resistor_RC0603-series, Initial_Board_Reference=MB1319, Internal_Part_Number=MCD-00223, Part_Type=Resistor, Provided_By=Subcon, Status=Released
R2: library part MCD-00070, "Resistor,1K,0603,1%,1/10W", Manufacturer=YAGEO, Manufacturer_Part_Number=RC0603FR-071KL, Package=R0603, ComponentLink1Description=Datasheet, ComponentLink1URL=http://tunmcdsvn.tun.st.com/Component_Datasheet_Library/Trunk/Resistors/Yageo_Resistor_RC0603-series, Initial_Board_Reference=MB1274, Internal_Part_Number=MCD-00070, Part_Type=Resistor, Provided_By=Subcon, Status=Released
R3: library part MCD-00189, "Resistor,22R,0402,1%,1/16W", Manufacturer=YAGEO, Manufacturer_Part_Number=RC0402FR-0722RL, Package=R0402, ComponentLink1Description=Datasheet, ComponentLink1URL=http://tunmcdsvn.tun.st.com/Component_Datasheet_Library/Trunk/Resistors/Yageo_Resistor_RC0402-series, Internal_Part_Number=MCD-00189, Part_Type=Resistor, Provided_By=Subcon, Status=Released
R5 R17 R21 R67: library part MCD-00119, "Resistor,100R,0402,1%,1/16W", Manufacturer=YAGEO, Manufacturer_Part_Number=RC0402FR-07100RL, Package=R0402, ComponentLink1Description=Datasheet, ComponentLink1URL=http://tunmcdsvn.tun.st.com/Component_Datasheet_Library/Trunk/Resistors/Yageo_Resistor_RC0402-series, Initial_Board_Reference=MB1262, Internal_Part_Number=MCD-00119, Part_Type=Resistor, Provided_By=Subcon, Status=Released
R6: library part MCD-00185, "Resistor,3K,0402,1%,1/16W", Manufacturer=YAGEO, Manufacturer_Part_Number=RC0402FR-073KL, Package=R0402, ComponentLink1Description=Datasheet, ComponentLink1URL=http://tunmcdsvn.tun.st.com/Component_Datasheet_Library/Trunk/Resistors/Yageo_Resistor_RC0402-series, Internal_Part_Number=MCD-00185, Part_Type=Resistor, Provided_By=Subcon, Status=Released
R7 R33 R34 R35: library part MCD-00220, "Resistor,10K,0603,1%,1/10W", Manufacturer=YAGEO, Manufacturer_Part_Number=RC0603FR-0710KL, Package=R0603, ComponentLink1Description=Datasheet, ComponentLink1URL=http://tunmcdsvn.tun.st.com/Component_Datasheet_Library/Trunk/Resistors/Yageo_Resistor_RC0603-series, Initial_Board_Reference=MB1319, Internal_Part_Number=MCD-00220, Part_Type=Resistor, Provided_By=Subcon, Status=Released
R8 R9 R74: library part MCD-00197, "Resistor,330R,0603,1%,1/10W", Manufacturer=YAGEO, Manufacturer_Part_Number=RC0603FR-07330RL, Package=R0603, ComponentLink1Description=Datasheet, ComponentLink1URL=http://tunmcdsvn.tun.st.com/Component_Datasheet_Library/Trunk/Resistors/Yageo_Resistor_RC0603-series, Internal_Part_Number=MCD-00197, Part_Type=Resistor, Provided_By=Subcon, Status=Released
R10 R11 R13 R23 R29: library part MCD-00481, "Resistor,47R,0402,1%,1/16W", Manufacturer=YAGEO, Manufacturer_Part_Number=RC0402FR-0747RL, Package=R0402, ComponentLink1Description=Datasheet, ComponentLink1URL=http://tunmcdsvn.tun.st.com/Component_Datasheet_Library/Trunk/Resistors/Yageo_Resistor_RC0402-series, Initial_Board_Reference=MBxxxx, Internal_Part_Number=MCD-00481, Part_Type=Resistor, Provided_By=SUBCO, Status=Released
R12: library part MCD-00500, "Resistor,620R,0603,1%,1/10W", Manufacturer=YAGEO, Manufacturer_Part_Number=RC0603FR-07620RL, Package=R0603, ComponentLink1Description=Datasheet, ComponentLink1URL=http://tunmcdsvn.tun.st.com/Component_Datasheet_Library/Trunk/Resistors/Yageo_Resistor_RC0603-series, Internal_Part_Number=MCD-00500, Part_Type=Resistor, Provided_By=Subcon, Status=Released
R14 R18 R20: library part MCD-00065, "Resistor,4K7,0402,1%,1/16W", Alternate_Manufacturer=YAGEO, Alternate_Manufacturer_Part_Number=RT0402FRE074K7L, Manufacturer_Part_Number=RC0402FR-074K7L, Package=R0402, ComponentLink1Description=Datasheet, ComponentLink1URL=http://tunmcdsvn.tun.st.com/Component_Datasheet_Library/Trunk/Resistors/Yageo_Resistor_RC0402-series, Initial_Board_Reference=MB1274, Internal_Part_Number=MCD-00065, Manufacturer=YAGEO, Part_Type=Resistor, Provided_By=Subcon, Status=Released
R15: library part MCD-00055, "Resistor,2K7,0402,1%,1/16W", Manufacturer=YAGEO, Manufacturer_Part_Number=RC0402FR-072K7L, Package=R0402, ComponentLink1Description=Datasheet, ComponentLink1URL=http://tunmcdsvn.tun.st.com/Component_Datasheet_Library/Trunk/Resistors/Yageo_Resistor_RC0402-series, Initial_Board_Reference=MB1274, Internal_Part_Number=MCD-00055, Part_Type=Resistor, Provided_By=Subcon, Status=Released
R22 R24 R25 R30 R40 R42 R43 R46 R48 R57 R60 R63: library part MCD-00053, "Resistor,10K,0402,1%,1/16W", Manufacturer=YAGEO, Manufacturer_Part_Number=RC0402FR-0710KL, Package=R0402, ComponentLink1Description=Datasheet, ComponentLink1URL=http://tunmcdsvn.tun.st.com/Component_Datasheet_Library/Trunk/Resistors/Yageo_Resistor_RC0402-series, Initial_Board_Reference=MB1274, Internal_Part_Number=MCD-00053, Part_Type=Resistor, Provided_By=subcon, Status=Released
R26 R27 R58 R59 R66: library part MCD-00441, "Resistor,270R,0402,1%,1/16W", Manufacturer=YAGEO, Manufacturer_Part_Number=RC0402FR-07270RL, Package=R0402, ComponentLink1Description=Datasheet, ComponentLink1URL=http://tunmcdsvn.tun.st.com/Component_Datasheet_Library/Trunk/Resistors/Yageo_Resistor_RC0402-series, Internal_Part_Number=MCD-00441, Part_Type=Resistor, Provided_By=Subcon, Status=Released
R28: library part MCD-00178, "Resistor,470R,0402,1%,1/16W", Manufacturer=YAGEO, Manufacturer_Part_Number=RC0402FR-07470RL, Package=R0402, ComponentLink1Description=Datasheet, ComponentLink1URL=http://tunmcdsvn.tun.st.com/Component_Datasheet_Library/Trunk/Resistors/Yageo_Resistor_RC0402-series, Internal_Part_Number=MCD-00178, Part_Type=Resistor, Provided_By=Subcon, Status=Released
R31: library part MCD-00443, "Resistor,27K,0402,1%,1/16W", Manufacturer=YAGEO, Manufacturer_Part_Number=RC0402FR-0727KL, Package=R0402, ComponentLink1Description=Datasheet, ComponentLink1URL=http://tunmcdsvn.tun.st.com/Component_Datasheet_Library/Trunk/Resistors/Yageo_Resistor_RC0402-series, Internal_Part_Number=MCD-00443, Part_Type=Resistor, Provided_By=Subcon, Status=Released
R32: library part MCD-00493, "Resistor,56K,0402,1%,1/16W", Manufacturer=YAGEO, Manufacturer_Part_Number=RC0402FR-0756KL, Package=R0402, ComponentLink1Description=Datasheet, ComponentLink1URL=http://tunmcdsvn.tun.st.com/Component_Datasheet_Library/Trunk/Resistors/Yageo_Resistor_RC0402-series, Internal_Part_Number=MCD-00493, Part_Type=Resistor, Provided_By=Subcon, Status=Released
R36 R37 R38 R39: library part MCD-00056, "Resistor,0R,0603,5%,1/10W", Manufacturer=YAGEO, Manufacturer_Part_Number=RC0603JR-070RL, Package=R0603, ComponentLink1Description=Datasheet, ComponentLink1URL=http://tunmcdsvn.tun.st.com/Component_Datasheet_Library/Trunk/Resistors/Yageo_Resistor_RC0603-series, Initial_Board_Reference=MB1274, Internal_Part_Number=MCD-00056, Part_Type=Resistor, Provided_By=subcon, Status=Released
R41 R44 R45 R49: library part MCD-00455, "Resistor,33R,0402,1%,1/16W", Manufacturer=YAGEO, Manufacturer_Part_Number=RC0402FR-0733RL, Package=R0402, ComponentLink1Description=Datasheet, ComponentLink1URL=http://tunmcdsvn.tun.st.com/Component_Datasheet_Library/Trunk/Resistors/Yageo_Resistor_RC0402-series, Internal_Part_Number=MCD-00455, Part_Type=Resistor, Provided_By=Subcon, Status=Released
R47: library part MCD-00068, "Resistor,1K5,0402,1%,1/16W", Manufacturer=YAGEO, Manufacturer_Part_Number=RC0402FR-071K5L, Package=R0402, ComponentLink1Description=Datasheet, ComponentLink1URL=http://tunmcdsvn.tun.st.com/Component_Datasheet_Library/Trunk/Resistors/Yageo_Resistor_RC0402-series, Initial_Board_Reference=MB1274, Internal_Part_Number=MCD-00068, Part_Type=Resistor, Provided_By=Subcon, Status=Released
R50: library part MCD-00052, "Resistor,0R,0402,5%,1/16W", Manufacturer=YAGEO, Manufacturer_Part_Number=RC0402JR-070RL, Package=R0402, ComponentLink1Description=Datasheet, ComponentLink1URL=http://tunmcdsvn.tun.st.com/Component_Datasheet_Library/Trunk/Resistors/Yageo_Resistor_RC0402-series, Initial_Board_Reference=MB1274, Internal_Part_Number=MCD-00052, Part_Type=Resistor, Provided_By=Subcon, Status=Released
R51: library part MCD-00723, "Resistor,12K1,0402,1%,1/16W", Manufacturer=YAGEO, Manufacturer_Part_Number=RC0402FR-0712K1L, Package=R0402, ComponentLink1Description=Datasheet, ComponentLink1URL=http://tunmcdsvn.tun.st.com/Component_Datasheet_Library/Trunk/Resistors/Yageo_Resistor_RC0402-series, Initial_Board_Reference=MB1271, Internal_Part_Number=MCD-00723, Part_Type=Resistor, Provided_By=Subcon, Status=Checked
R52 R53 R54 R55: library part MCD-00515, "Resistor,75R,0402,1%,1/16W", Manufacturer=YAGEO, Manufacturer_Part_Number=RC0402FR-0775RL, Package=R0402, ComponentLink1Description=Datasheet, ComponentLink1URL=http://tunmcdsvn.tun.st.com/Component_Datasheet_Library/Trunk/Resistors/Yageo_Resistor_RC0402-series, Internal_Part_Number=MCD-00515, Part_Type=Resistor, Provided_By=Subcon, Status=Released
R56 R61 R62: library part MCD-00063, "Resistor,47K,0402,1%,1/16W", Manufacturer=YAGEO, Manufacturer_Part_Number=RC0402FR-0747KL, Package=R0402, ComponentLink1Description=Datasheet, ComponentLink1URL=http://tunmcdsvn.tun.st.com/Component_Datasheet_Library/Trunk/Resistors/Yageo_Resistor_RC0402-series, Initial_Board_Reference=MB1274, Internal_Part_Number=MCD-00063, Part_Type=Resistor, Provided_By=Subcon, Status=Released
R65: library part MCD-00461, "Resistor,360R,0402,1%,1/16W", Manufacturer=YAGEO, Manufacturer_Part_Number=RC0402FR-07360RL, Package=R0402, ComponentLink1Description=Datasheet, ComponentLink1URL=http://tunmcdsvn.tun.st.com/Component_Datasheet_Library/Trunk/Resistors/Yageo_Resistor_RC0402-series, Internal_Part_Number=MCD-00461, Part_Type=Resistor, Provided_By=Subcon, Status=Released
R71 R72 R73: library part MCD-00222, "Resistor,47K,0603,1%,1/10W", Manufacturer=YAGEO, Manufacturer_Part_Number=RC0603FR-0747KL, Package=R0603, ComponentLink1Description=Datasheet, ComponentLink1URL=http://tunmcdsvn.tun.st.com/Component_Datasheet_Library/Trunk/Resistors/Yageo_Resistor_RC0603-series, Initial_Board_Reference=MB1319, Internal_Part_Number=MCD-00222, Part_Type=Resistor, Provided_By=Subcon, Status=Released
R75 R76 R77 R78: library part MCD-00565, "Resistor,49R9,0402,1%,1/16W", Manufacturer=YAGEO, Manufacturer_Part_Number=RC0402FR-0749R9L, Package=R0402, ComponentLink1Description=Datasheet, ComponentLink1URL=http://tunmcdsvn.tun.st.com/Component_Datasheet_Library/Trunk/Resistors/Yageo_Resistor_RC0402-series, Internal_Part_Number=MCD-00565, Part_Type=Resistor, Provided_By=Subcon, Status=Released
SB1 SB2 SB3 SB4 SB5 SB6 SB7 SB8 SB9 SB10 SB11 SB12 SB13 SB14 SB15 SB16 SB17 SB18 SB19 SB20 SB21 SB22 SB23 SB24 SB25 SB26 SB27 SB29 SB30 SB31 SB32 SB33 SB34 SB35 SB36 SB39 SB40 SB41 SB42 SB43 SB44 SB45 SB46 SB47 SB51 SB52 SB56 SB57 SB58 SB64 SB72 SB74 SB76 SB77 SB78 SB79 SB80: library part MCD-00071, "Solder Bridge ON", ComponentLink1Description=Datasheet, Initial_Board_Reference=MB1274, Internal_Part_Number=MCD-00071, Part_Type=Mechanical, Provided_By=Subcon, Status=Released
SB28 SB37 SB38 SB48 SB49 SB50 SB53 SB54 SB55 SB59 SB60 SB61 SB62 SB63 SB65 SB66 SB67 SB68 SB69 SB70 SB71 SB73 SB75 SB81 SB82: library part MCD-01618, "Solder Bridge 0402 ON", Manufacturer=YAGEO, Manufacturer_Part_Number=RC0402JR-070RL, Package=SB0402, ComponentLink1Description=Datasheet, ComponentLink1URL=http://tunmcdsvn.tun.st.com/Component_Datasheet_Library/Trunk/Resistors/Yageo_Resistor_RC0402-series, Internal_Part_Number=MCD-01618, Part_Type=Mechanical, Provided_By=SUBCO, Status="Footprint available"
TP1 TP2 TP3 TP4: library part MCD-00074, "Test Point 1mm", Manufacturer=n/a, ComponentLink1Description=Datasheet, ComponentLink1URL=http://na, Initial_Board_Reference=MB1274, Internal_Part_Number=MCD-00074, Manufacturer_Part_Number=n/a, Part_Type=Mechanical, Provided_By=n/a, Status=Released
U1 U10: library part MCD-00264, "Dual bit dual supply bus transceiver", Manufacturer="TEXAS INSTRUMENTS", ComponentLink1Description=Datasheet, ComponentLink1URL=http://tunmcdsvn.tun.st.com/Component_Datasheet_Library/Trunk/IC/TI_Dual_bit_tranceiver_SN74LVC2T45, Initial_Board_Reference=MB1319, Internal_Part_Number=MCD-00264, Manufacturer_Part_Number=SN74LVC2T45DCUT, Part_Type=IC, Provided_By=Subcon, Status=Released
U2: library part MCD-00159, "500mA, Enhanced single channel power switches with active high enable pin", Alternate_Manufacturer="TEXAS INSTRUMENTS", Alternate_Manufacturer_Part_Number=TPS2051C, Manufacturer=STMICROELECTRONICS, ComponentLink1Description=Datasheet, ComponentLink1URL=http://tunmcdsvn.tun.st.com/Component_Datasheet_Library/Trunk/IC/STM_PWR-Switch_STMPS2151STR, Initial_Board_Reference=MB1264, Internal_Part_Number=MCD-00159, Manufacturer_Part_Number=STMPS2151STR, Part_Type=IC, Provided_By=Subcon, Status=Checked
U3 U4 U20 U22 U23: library part MCD-00170, "ESD protection 6V1", Manufacturer=STMICROELECTRONICS, Manufacturer_Part_Number=ESDALC6V1-1U2, ComponentLink1Description=Datasheet, ComponentLink1URL=http://tunmcdsvn.tun.st.com/Component_Datasheet_Library/Trunk/Diodes/STM_ESD_ESDALC6V1-1U2, Initial_Board_Reference=MB1274, Internal_Part_Number=MCD-00170, Part_Type=Diode, Provided_By=Subcon, Status=Released
U5: library part MCD-00649, "Common mode filter with ESD protection for USB 2.0 interface", Manufacturer=STMICROELECTRONICS, ComponentLink1Description=Datasheet, ComponentLink1URL=http://tunmcdsvn.tun.st.com/Component_Datasheet_Library/Trunk/Diodes/STM_ESD_ECMF02-2AMX6, Initial_Board_Reference=MB1248, Internal_Part_Number=MCD-00649, Manufacturer_Part_Number=ECMF02-2AMX6, Part_Type=Diode, Provided_By=Subcon, Status=Checked
U6 U21: library part MCD-00251, "High power transient voltage suppressor, 7V breakdown", Manufacturer=STMICROELECTRONICS, Manufacturer_Part_Number=ESDA7P60-1U1M, ComponentLink1Description=Datasheet, ComponentLink1URL=http://tunmcdsvn.tun.st.com/Component_Datasheet_Library/Trunk/Diodes/STM_ESD_ESDA7P60-1U1M, Initial_Board_Reference=MB1311, Internal_Part_Number=MCD-00251, Part_Type=Diode, Provided_By=Subcon, Status=Released
U7: library part MCD-00596, "STM32F723IEK  (STM32F7) BGA176", Manufacturer=STMICROELECTRONICS, Manufacturer_Part_Number=STM32F723IEK6, BMS_Part_Number=9175300, ComponentLink1Description=Datasheet, ComponentLink1URL=http://tunmcdsvn.tun.st.com/Component_Datasheet_Library/Trunk/IC/BGA176+25L_10x10x0.6_pitch0.65, Initial_Board_Reference=MB1331, Internal_Part_Number=MCD-00596, Part_Type=IC, Provided_By="SUBCO with ST control", Status=Checked
U8 U24: library part MCD-00136, "Dual Transil array for ESD protection", Manufacturer=STMICROELECTRONICS, ComponentLink1Description=Datasheet, ComponentLink1URL=http://tunmcdsvn.tun.st.com/Component_Datasheet_Library/Trunk/Diodes/STM_ESD_ESDALC6V1W5, Initial_Board_Reference=MB1262, Internal_Part_Number=MCD-00136, Manufacturer_Part_Number=ESDALC6V1W5, Part_Type=Diode, Provided_By=Subcon, Status=Released
U9: library part MCD-00086, "Ultra low drop-low noise BiCMOS voltage, regulators low ESR capacitors compatible", Manufacturer=STMICROELECTRONICS, ComponentLink1Description=Datasheet, ComponentLink1URL=http://tunmcdsvn.tun.st.com/Component_Datasheet_Library/Trunk/IC/STM_LDO_LD3985, Initial_Board_Reference=MB1274, Internal_Part_Number=MCD-00086, Manufacturer_Part_Number=LD3985M33R, Part_Type=IC, Provided_By=Subcon, Status=Released
U11: library part MCD-01025, "LDO, 3.3V, 1.3A, Very low quiescent current BiCMOS voltage regulator", Manufacturer=STMICROELECTRONICS, Package=DFN6-3x3, ComponentLink1Description=Datasheet, ComponentLink1URL=http://tunmcdsvn.tun.st.com/Component_Datasheet_Library/Trunk/IC/STM_LDO_ST1L05CPU33R, Initial_Board_Reference=MB1331, Internal_Part_Number=MCD-01025, Manufacturer_Part_Number=ST1L05CPU33R, Part_Type=IC, Provided_By=STM, Status=Checked
U12: library part MCD-00088, "IC REG LDO 5V 0.8A SOT223", Manufacturer=STMICROELECTRONICS, Package=SOT-223, ComponentLink1Description=Datasheet, ComponentLink1URL=http://tunmcdsvn.tun.st.com/Component_Datasheet_Library/Trunk/IC/STM_LDO_LD1117, Initial_Board_Reference=MB1274, Internal_Part_Number=MCD-00088, Manufacturer_Part_Number=LD1117S50TR, Part_Type=IC, Provided_By=Subcon, Status=Released
U13: library part MCD-00581, "LDO Linear Voltage Regulator IC Positive Adjustable 1 Output Adjustable 1.3A 6-DFN (3x3)", Manufacturer=STMICROELECTRONICS, Package="DFN6 (3x3)", ComponentLink1Description=Datasheet, ComponentLink1URL=http://tunmcdsvn.tun.st.com/Component_Datasheet_Library/Trunk/IC/STM_LDO_ST1L05BPUR, Initial_Board_Reference=MB1331, Internal_Part_Number=MCD-00581, Manufacturer_Part_Number=ST1L05BPUR, Part_Type=IC, Provided_By=Subcon, Status=Checked
U14: library part MCD-01349, "STM32H7A3ZIT6, LQFP144 package, 20x20", Manufacturer=STMICROELECTRONICS, Package=LQFP144, ComponentLink1Description=Datasheet, ComponentLink1URL=http://tunmcdsvn.tun.st.com/Component_Datasheet_Library/Trunk/IC/STM_STM32L552ZET6QU, Initial_Board_Reference=MB1364, Internal_Part_Number=MCD-01349, Manufacturer_Part_Number=STM32H7A3ZIT6, Part_Type=IC, Provided_By="SUBCO with ST control", Status="Footprint available"
U15: library part MCD-00719, "10/100M RMII Ethernet transceiver", Manufacturer=MICROCHIP, ComponentLink1Description=Datasheet, ComponentLink1URL=http://tunmcdsvn.tun.st.com/Component_Datasheet_Library/Trunk/IC/MICROCHIP_LAN8742A_RMII_PHY, Initial_Board_Reference=MB1271, Internal_Part_Number=MCD-00719, Manufacturer_Part_Number=LAN8742A-CZ-TR, Part_Type=IC, Provided_By=Subcon, Status=Checked
U16: library part MCD-00250, "Very low capacitance ESD protection , 4 lines", Manufacturer=STMICROELECTRONICS, ComponentLink1Description=Datasheet, ComponentLink1URL=http://tunmcdsvn.tun.st.com/Component_Datasheet_Library/Trunk/Diodes/STM_ESD_USBLC6-4SC6, Initial_Board_Reference=MB1311, Internal_Part_Number=MCD-00250, Manufacturer_Part_Number=USBLC6-4SC6, Part_Type=IC, Provided_By=Subcon, Status=Released
U17: library part MCD-00718, "Discrete Magnetic Transformer Module, 16 pins, SMT, 100 Base-TX", Manufacturer="DONGGUAN KEYOUDA ELECTRONIC TECHNOLOGY", ComponentLink1Description=Datasheet, ComponentLink1URL=http://tunmcdsvn.tun.st.com/Component_Datasheet_Library/Trunk/IC/DGKYD_KMS-1102NL, Initial_Board_Reference=MB1271, Internal_Part_Number=MCD-00718, Manufacturer_Part_Number=KMS-1102NL, Part_Type=IC, Provided_By=Subcon, Status=Checked
U18: library part MCD-00083, "Enhanced single channel power switches with active low enable pin", Alternate_Manufacturer="TEXAS INSTRUMENTS", Alternate_Manufacturer_Part_Number=TPS2041C, Manufacturer=STMICROELECTRONICS, ComponentLink1Description=Datasheet, ComponentLink1URL=http://tunmcdsvn.tun.st.com/Component_Datasheet_Library/Trunk/IC/STM_PWR-Switch_STMPS2141STR, Initial_Board_Reference=MB1274, Internal_Part_Number=MCD-00083, Manufacturer_Part_Number=STMPS2141STR, Part_Type=IC, Provided_By=Subcon, Status=Released